# Altium PCB MainBoardPCB_3.PcbDoc (part 15 of 36)
Units mm, origin at the board's own origin, x right, y up, seen from the top; angles counter-clockwise.
Board outline 258.95 x 308.86 mm, 16 copper layers (L1, L2 (GND), L3 (Sign), L4 (GND), L5 (Sign), L6 (PWR/GND), L7(PWR/GND), L8 (Plane_GND), L9 (PWR/GND), L10 (PWR/GND), L11 (PWR/GND), L12 (Sign), L13 (GND), L14 (Sign), L15 (GND), L16), stack 2.502 mm thick; 2402 components, 1749 nets, 8407 pads, 3409 vias.
Unrouted connection lines stored in the file: 4352.
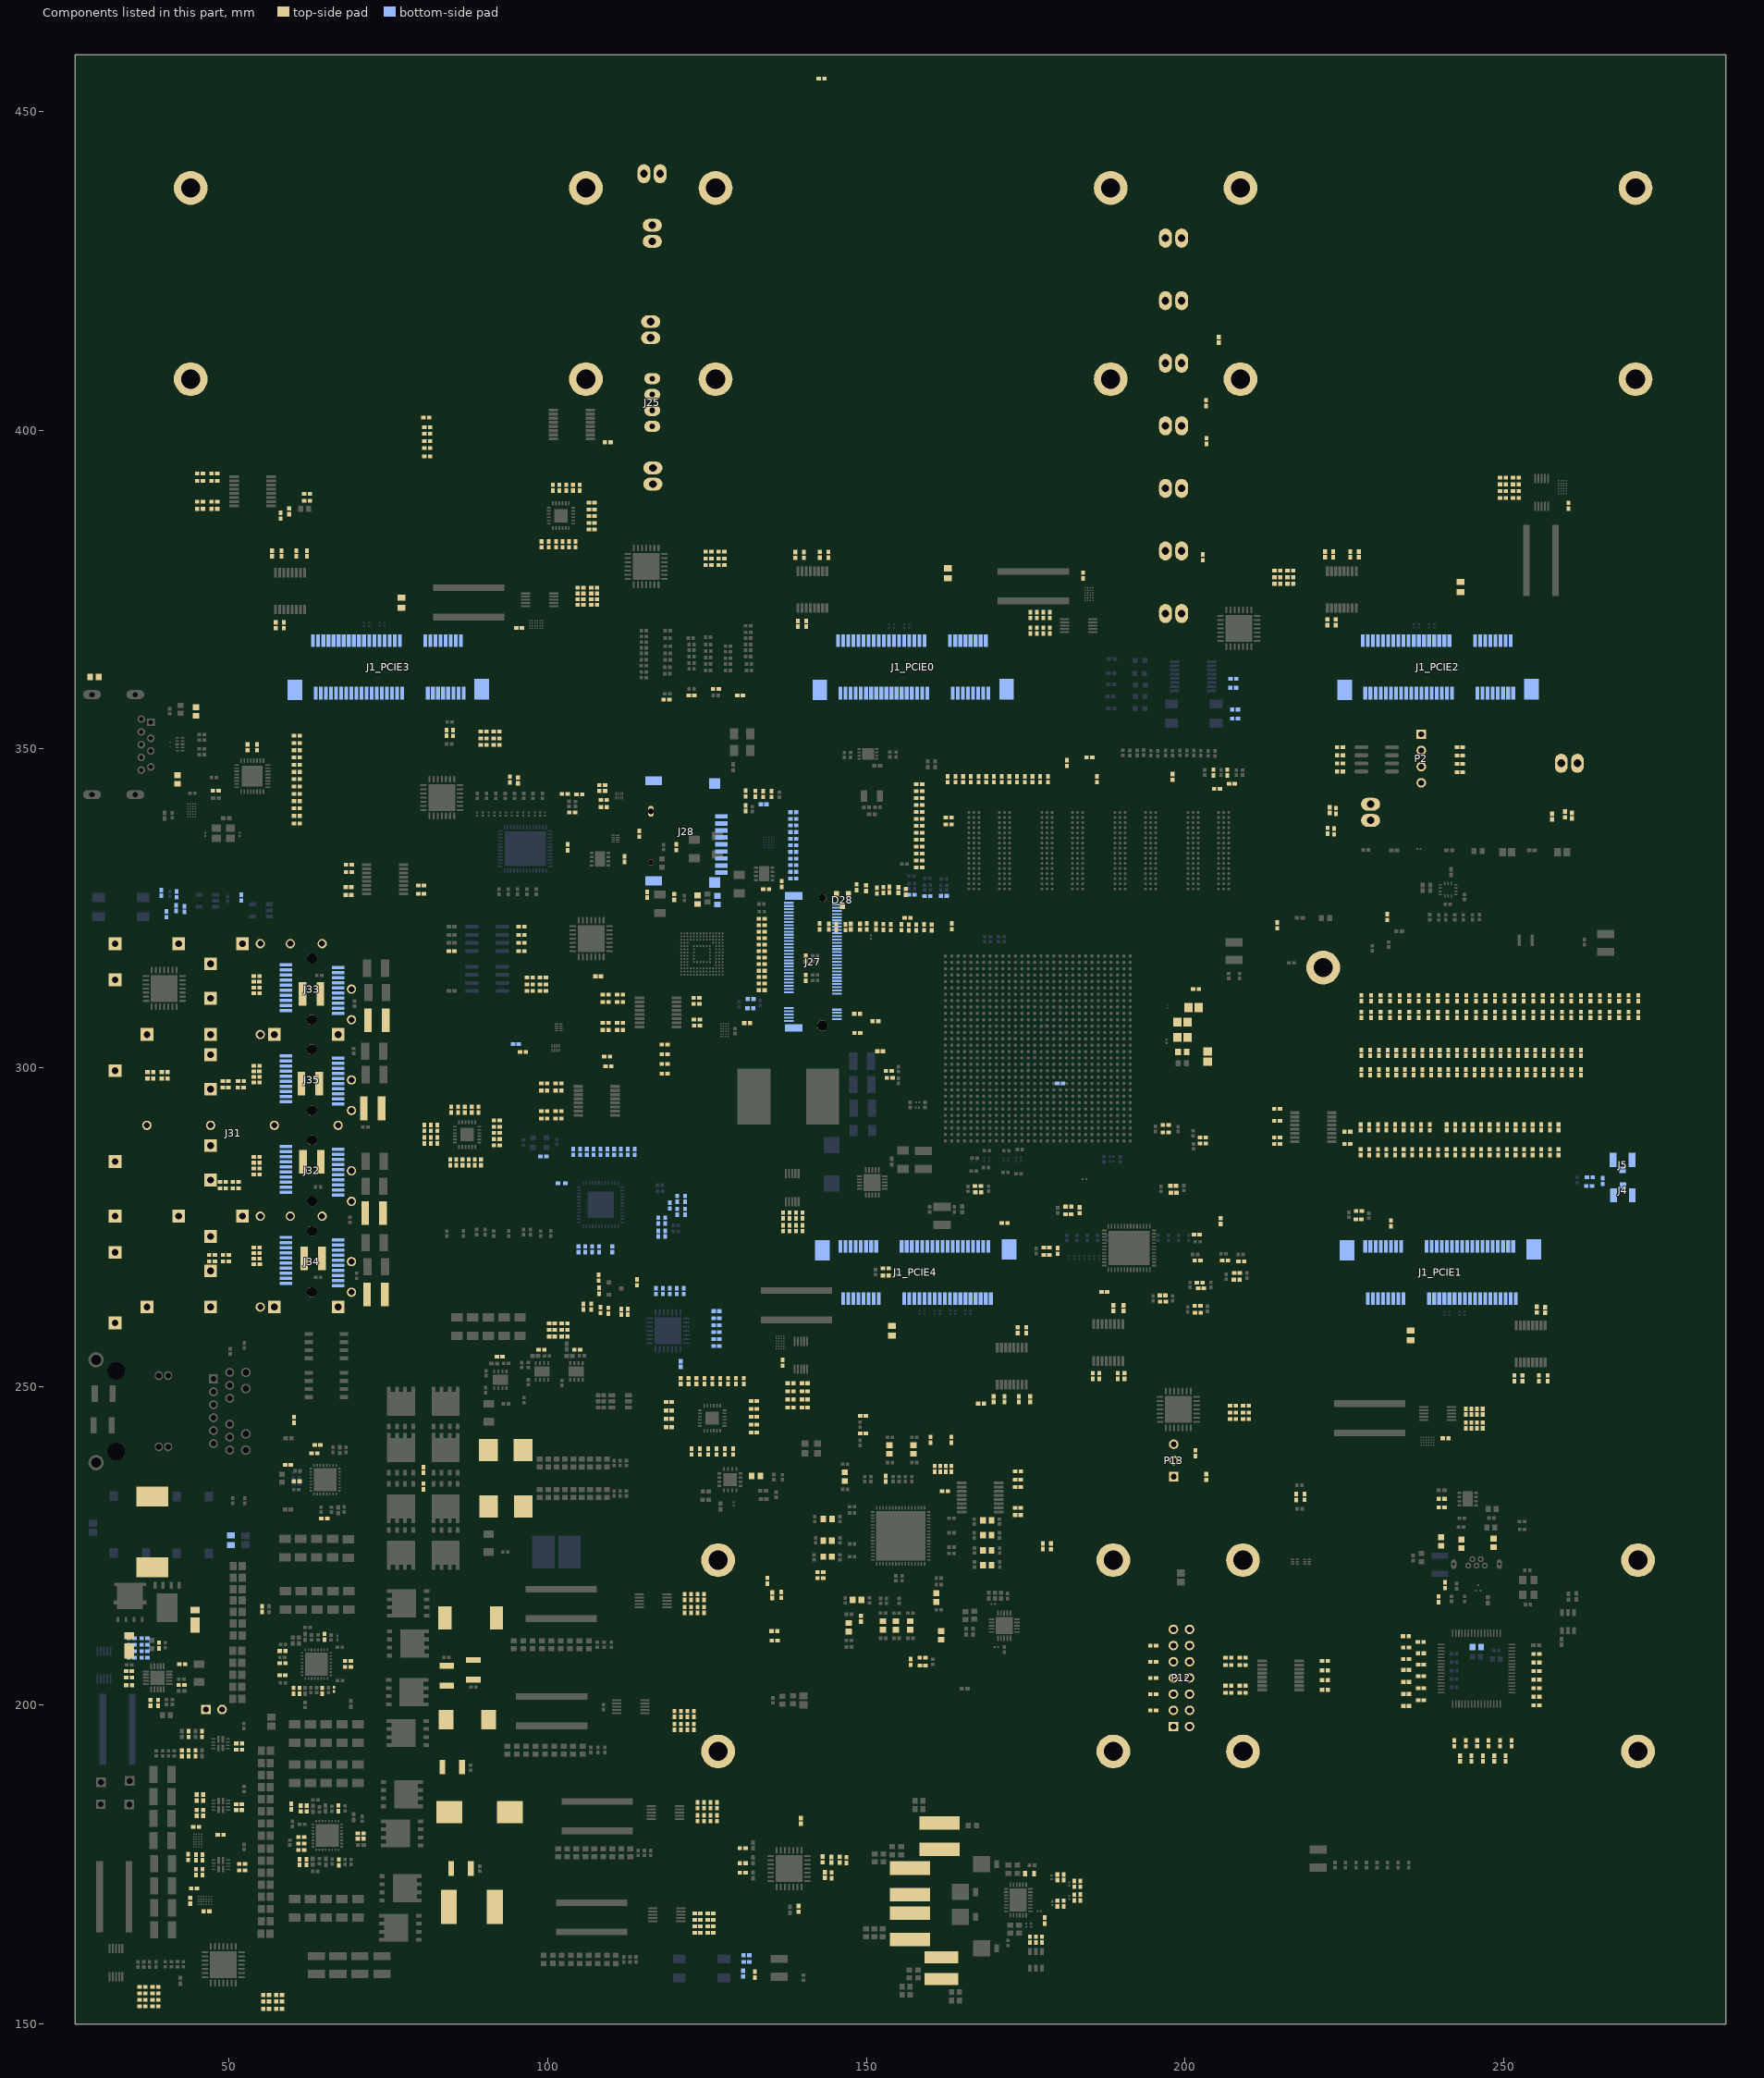
[diagram p20: the components of this part, seen from the top]

## Part data (continued)
R113: library part Resistor, "Thick Film Resistors 34.8K OHM 1%", Case Code (Imperial)=0402, Case Code (Metric)=1005, Manufacturer=Yageo, Manufacturer Part Number=RC0402FR-0734K8L, Max Operating Temperature=155°C, Max Power Dissipation=63mW, Min Operating Temperature=-55°C, Power Rating=62.5mW, Supplier Part Number 1=YAG3125CT-ND, Temperature Coefficient=100ppm/°C, Tolerance=1%, Voltage Rating=50V, Case/Package=0402, Category="Chip SMD Resistors", ComponentLink1Description=https://datasheet.ciiva.com/16857/pyu-rc0402-51-rohs-l-6-16857399.pdf?src-supplier=Avnet+Europe, ComponentLink1URL=https://datasheet.ciiva.com/16857/pyu-rc0402-51-rohs-l-6-16857399.pdf?src-supplier=Avnet+Europe, ComponentLink2Description=https://datasheet.ciiva.com/26830/getdatasheetpartid-323739-26830055.pdf?src-supplier=Verical, ComponentLink2URL=https://datasheet.ciiva.com/26830/getdatasheetpartid-323739-26830055.pdf?src-supplier=Verical, ComponentLink3Description=https://datasheet.ciiva.com/12656/pyu-rc0402-51-rohs-l-6-r-12656904.pdf?src-supplier=Mouser, ComponentLink3URL=https://datasheet.ciiva.com/12656/pyu-rc0402-51-rohs-l-6-r-12656904.pdf?src-supplier=Mouser, ComponentLink4Description=https://datasheet.ciiva.com/28400/pyu-rc0402-51-rohs-l-6-28400889.pdf?src-supplier=Avnet+Europe, ComponentLink4URL=https://datasheet.ciiva.com/28400/pyu-rc0402-51-rohs-l-6-28400889.pdf?src-supplier=Avnet+Europe, ComponentLink5Description=https://datasheet.ciiva.com/8889/pyu-rc0402-51-rohs-l-6-8889501.pdf?src-supplier=Avnet, ComponentLink5URL=https://datasheet.ciiva.com/8889/pyu-rc0402-51-rohs-l-6-8889501.pdf?src-supplier=Avnet, Composition="Thick Film", Contact Plating=Tin,Matte, Depth=0.5mm, Features="Moisture Resistant", Height=0.016inch, Lead Free="Lead Free", Length=1mm, Military Standard=Not, Number of Terminations=2, Packaging="Tape and Reel", Pricing 1="1=0,10000, 10=0,01600, 100=0,00640, 1000=0,00289, 2500=0,00251, 5000=0,00207 (USD)", Resistance=34.8kR, RoHS=Yes, Stock 1=121134, Supplier 1=Digi-Key, Termination=SMD/SMT, Voltage Rating (DC)=50V, Width=0.02inch
R114 R274 R515 R522 R523 R531 R546 R548 R549 R551 R552 R554 R555 R557: library part Resistor, Case Code (Imperial)=0402, Case Code (Metric)=1005, Manufacturer 1=Yageo, Manufacturer Part Number 1=RC0402FR-0710KL, Max Operating Temperature=155°C, Min Operating Temperature=-55°C, Power Rating=62.5mW, Supplier Part Number 1=311-10.0KLRCT-ND, Temperature Coefficient=100ppm/°C, Tolerance=1%, Voltage Rating=50V, Case/Package=0402, ComponentLink1Description=https://datasheet.ciiva.com/7660/38568-7660787.pdf?src-supplier=Element14, ComponentLink1URL=https://datasheet.ciiva.com/7660/38568-7660787.pdf?src-supplier=Element14, ComponentLink2Description=https://datasheet.ciiva.com/7849/1784430-7849813.pdf?src-supplier=Element14, ComponentLink2URL=https://datasheet.ciiva.com/7849/1784430-7849813.pdf?src-supplier=Element14, ComponentLink3Description=https://datasheet.ciiva.com/7849/1686128-7849814.pdf?src-supplier=Element14, ComponentLink3URL=https://datasheet.ciiva.com/7849/1686128-7849814.pdf?src-supplier=Element14, ComponentLink4Description=https://datasheet.ciiva.com/7849/1784430-7849815.pdf?src-supplier=Element14, ComponentLink4URL=https://datasheet.ciiva.com/7849/1784430-7849815.pdf?src-supplier=Element14, ComponentLink5Description=https://datasheet.ciiva.com/22747/1018594-22747512.pdf?src-supplier=Element14, ComponentLink5URL=https://datasheet.ciiva.com/22747/1018594-22747512.pdf?src-supplier=Element14, ComponentLink6Description=https://datasheet.ciiva.com/12667/pyu-rc0402-51-rohs-l-6-r-12667067.pdf?src-supplier=Mouser, ComponentLink6URL=https://datasheet.ciiva.com/12667/pyu-rc0402-51-rohs-l-6-r-12667067.pdf?src-supplier=Mouser, ComponentLink7Description=https://datasheet.ciiva.com/7983/1018594-7983486.pdf?src-supplier=Element14, ComponentLink7URL=https://datasheet.ciiva.com/7983/1018594-7983486.pdf?src-supplier=Element14, Composition="Thick Film", Depth=0.5mm, Height=0.32mm, Lead Free="Lead Free", Lead Pitch=0.2mm, Length=1mm, Military Standard=Not, Number of Pins=2, Number of Terminations=2, Packaging="Tape and Reel", Pricing 1="1=0,10000, 10=0,01500, 100=0,00600, 1000=0,00270, 2500=0,00235, 5000=0,00194 (USD)", REACH SVHC="No SVHC", Resistance=10kR, RoHS=Yes, Stock 1=71214322, Supplier 1=Digi-Key, Termination=SMD/SMT, Voltage Rating (DC)=50V, Width=0.5mm, Working Voltage=50V
R127 R128 R129 R366: library part Resistor, "SMT Resistor", Case/Package=0402, Case Code (Metric)=1005, Manufacturer=Panasonic, Manufacturer Part Number=ERJ-2RKF1002X, Max Operating Temperature=155°C, Max Power Dissipation=100mW, Min Operating Temperature=-55°C, Package Quantity=1, Supplier Part Number 1=P10.0KLCT-ND, Temperature Coefficient=100ppm/°C, Tolerance=1%, Voltage Rating=50V, Case Code (Imperial)=0402, ComponentLink1Description=https://datasheet.ciiva.com/11821/0900766b80f80784-11821171.pdf?src-supplier=RSComponents, ComponentLink1URL=https://datasheet.ciiva.com/11821/0900766b80f80784-11821171.pdf?src-supplier=RSComponents, ComponentLink2Description=https://datasheet.ciiva.com/16199/aoa0000ce2-16199478.pdf?src-supplier=Future+Electronics, ComponentLink2URL=https://datasheet.ciiva.com/16199/aoa0000ce2-16199478.pdf?src-supplier=Future+Electronics, ComponentLink3Description=https://datasheet.ciiva.com/17212/aoa0000ce2-17212102.pdf?src-supplier=Avnet+Europe, ComponentLink3URL=https://datasheet.ciiva.com/17212/aoa0000ce2-17212102.pdf?src-supplier=Avnet+Europe, ComponentLink4Description=https://datasheet.ciiva.com/43467/1678782-43467402.pdf?src-supplier=Farnell, ComponentLink4URL=https://datasheet.ciiva.com/43467/1678782-43467402.pdf?src-supplier=Farnell, ComponentLink5Description=https://datasheet.ciiva.com/9194/aoa0000ce2-9194142.pdf?src-supplier=Avnet, ComponentLink5URL=https://datasheet.ciiva.com/9194/aoa0000ce2-9194142.pdf?src-supplier=Avnet, ComponentLink6Description=https://datasheet.ciiva.com/16786/70260748-16786734.pdf?src-supplier=Allied+Electronics, ComponentLink6URL=https://datasheet.ciiva.com/16786/70260748-16786734.pdf?src-supplier=Allied+Electronics, ComponentLink7Description=https://datasheet.ciiva.com/24023/aoa0000ce2-24023017.pdf?src-supplier=Mouser, ComponentLink7URL=https://datasheet.ciiva.com/24023/aoa0000ce2-24023017.pdf?src-supplier=Mouser, ComponentLink8Description=https://datasheet.ciiva.com/28514/1678782-28514185.pdf?src-supplier=Element14, ComponentLink8URL=https://datasheet.ciiva.com/28514/1678782-28514185.pdf?src-supplier=Element14, ComponentLink9Description=https://datasheet.ciiva.com/27055/1987020-27055643.pdf?src-supplier=Jameco, ComponentLink9URL=https://datasheet.ciiva.com/27055/1987020-27055643.pdf?src-supplier=Jameco, ComponentLink10Description=https://datasheet.ciiva.com/48531/aoa0000ce2-48531069.pdf?src-supplier=Avnet, ComponentLink10URL=https://datasheet.ciiva.com/48531/aoa0000ce2-48531069.pdf?src-supplier=Avnet, ComponentLink11Description=https://datasheet.ciiva.com/16782/70260748-16782590.pdf?src-supplier=Allied+Electronics, ComponentLink11URL=https://datasheet.ciiva.com/16782/70260748-16782590.pdf?src-supplier=Allied+Electronics, ComponentLink12Description=https://datasheet.ciiva.com/30201/aoa0000ce2-30201022.pdf?src-supplier=Onlinecomponents.com, ComponentLink12URL=https://datasheet.ciiva.com/30201/aoa0000ce2-30201022.pdf?src-supplier=Onlinecomponents.com, Composition="Thick Film", Contact Plating=Tin, Depth=0.5mm, Features="Automotive AEC-Q200", Height=0.35mm, Lead Free="Lead Free", Length=1mm, Military Standard=Not, Mount="Surface Mount", Number of Pins=2, Number of Terminations=2, Packaging="Tape and Reel", Power Rating=100mW, Pricing 1="1 = 0,10000, 10 = 0,04300, 100 = 0,01750, 1000 = 0,00787, 2500 = 0,00683, 5000 = 0,00564 (USD)", Radiation Hardening=No, REACH SVHC="No SVHC", Resistance=10kR, RoHS=Yes, Stock 1=7512515, Supplier 1=Digi-Key, Termination=SMD/SMT, Voltage Rating (DC)=50V, Width=0.02inch
R140: library part Resistor, "RES SMD 2.2 OHM 5% 1/16W 0402", Case Code (Imperial)=0402, Case Code (Metric)=1005, Manufacturer=Yageo, Manufacturer Part Number=RC0402JR-072R2L, Max Operating Temperature=155°C, Max Power Dissipation=63mW, Min Operating Temperature=-55°C, Package Quantity=1, Power Rating=62.5mW, Supplier Part Number 1=311-2.2JRCT-ND, Temperature Coefficient=200ppm/°C, Tolerance=5%, Voltage Rating=50V, Case/Package=0402, Category="Chip SMD Resistors", ComponentLink1Description=https://datasheet.ciiva.com/2452/pyu-r-int-thick-7-2452737.pdf?src-supplier=Digi-Key, ComponentLink1URL=https://datasheet.ciiva.com/2452/pyu-r-int-thick-7-2452737.pdf?src-supplier=Digi-Key, ComponentLink2Description=https://datasheet.ciiva.com/2452/pyu-r-int-thick-7-2452738.pdf?src-supplier=Digi-Key, ComponentLink2URL=https://datasheet.ciiva.com/2452/pyu-r-int-thick-7-2452738.pdf?src-supplier=Digi-Key, ComponentLink3Description=https://datasheet.ciiva.com/2452/pyu-r-int-thick-7-2452739.pdf?src-supplier=Digi-Key, ComponentLink3URL=https://datasheet.ciiva.com/2452/pyu-r-int-thick-7-2452739.pdf?src-supplier=Digi-Key, ComponentLink4Description=https://datasheet.ciiva.com/28639/1018594-28639893.pdf?src-supplier=Element14, ComponentLink4URL=https://datasheet.ciiva.com/28639/1018594-28639893.pdf?src-supplier=Element14, ComponentLink5Description=https://datasheet.ciiva.com/28415/pyu-rc0402-51-rohs-l-6-28415222.pdf?src-supplier=Avnet+Europe, ComponentLink5URL=https://datasheet.ciiva.com/28415/pyu-rc0402-51-rohs-l-6-28415222.pdf?src-supplier=Avnet+Europe, ComponentLink6Description=https://datasheet.ciiva.com/16863/pyu-rc0402-51-rohs-l-6-16863111.pdf?src-supplier=Avnet+Europe, ComponentLink6URL=https://datasheet.ciiva.com/16863/pyu-rc0402-51-rohs-l-6-16863111.pdf?src-supplier=Avnet+Europe, ComponentLink7Description=https://datasheet.ciiva.com/8894/pyu-rc0402-51-rohs-l-6-8894569.pdf?src-supplier=Avnet, ComponentLink7URL=https://datasheet.ciiva.com/8894/pyu-rc0402-51-rohs-l-6-8894569.pdf?src-supplier=Avnet, ComponentLink8Description=https://datasheet.ciiva.com/15189/getdatasheetpartid-470524-15189562.pdf?src-supplier=Verical, ComponentLink8URL=https://datasheet.ciiva.com/15189/getdatasheetpartid-470524-15189562.pdf?src-supplier=Verical, ComponentLink9Description=https://datasheet.ciiva.com/12557/pyu-rc0402-51-rohs-l-6-r-8721-12557918.pdf?src-supplier=Mouser, ComponentLink9URL=https://datasheet.ciiva.com/12557/pyu-rc0402-51-rohs-l-6-r-8721-12557918.pdf?src-supplier=Mouser, Composition="Thick Film", Contact Plating=Tin,Matte,Lead, Depth=0.5mm, Features="Moisture Resistant", Height=0.016inch, Lead Free="Lead Free", Length=1mm, Military Standard=Not, Number of Pins=2, Number of Terminations=2, Packaging="Tape and Reel", Pricing 1="1=0,10000, 10=0,01900, 100=0,00760, 1000=0,00342, 2500=0,00297, 5000=0,00245 (USD)", Radiation Hardening=No, REACH SVHC="No SVHC", Resistance=2.2R, RoHS=Yes, Stock 1=928927, Supplier 1=Digi-Key, Termination=SMD/SMT, Voltage Rating (DC)=50V, Width=0.02inch, Working Voltage=50V
R149: library part Resistor, "Thick Film Resistors - SMD 196K OHM 1%", Case/Package=0402, Case Code (Metric)=1005, Manufacturer=Yageo, Manufacturer Part Number=RC0402FR-07196KL, Max Operating Temperature=155°C, Max Power Dissipation=63mW, Min Operating Temperature=-55°C, Power Rating=62.5mW, Supplier Part Number 1=YAG3024CT-ND, Temperature Coefficient=100ppm/°C, Tolerance=1%, Voltage Rating=50V, Case Code (Imperial)=0402, Category="Chip SMD Resistors", ComponentLink1Description=https://datasheet.ciiva.com/28419/pyu-rc0402-51-rohs-l-6-28419942.pdf?src-supplier=Avnet+Europe, ComponentLink1URL=https://datasheet.ciiva.com/28419/pyu-rc0402-51-rohs-l-6-28419942.pdf?src-supplier=Avnet+Europe, ComponentLink2Description=https://datasheet.ciiva.com/16869/pyu-rc0402-51-rohs-l-6-16869399.pdf?src-supplier=Avnet+Europe, ComponentLink2URL=https://datasheet.ciiva.com/16869/pyu-rc0402-51-rohs-l-6-16869399.pdf?src-supplier=Avnet+Europe, Composition="Thick Film", Contact Plating=Tin,Lead, Depth=0.5mm, Features="Moisture Resistant", Height=0.016inch, Lead Free="Lead Free", Length=1mm, Military Standard=Not, Number of Terminations=2, Packaging="Tape and Reel", Pricing 1="1=0,10000, 10=0,01600, 100=0,00640, 1000=0,00289, 2500=0,00251, 5000=0,00207 (USD)", Radiation Hardening=No, Resistance=196kR, RoHS=Yes, Stock 1=126965, Supplier 1=Digi-Key, Termination=SMD/SMT, Width=0.5mm
R150: library part Resistor, "TE CONNECTIVITY - CRGCQ0402F22K - RES, 22K, 1%, 0402, THICK FILM", Manufacturer="TE Connectivity", Manufacturer Part Number=CRGCQ0402F22K, Supplier Part Number 1=A129643CT-ND, ComponentLink1Description=http://www.farnell.com/datasheets/2609223.pdf?src-supplier=Farnell, ComponentLink1URL=http://www.farnell.com/datasheets/2609223.pdf?src-supplier=Farnell, Pricing 1="1=0,10000, 10=0,02100, 100=0,00860, 1000=0,00387, 2500=0,00336, 5000=0,00277 (USD)", RoHS=No, Stock 1=153295, Supplier 1=Digi-Key
R159 R737 R746 R747 R748 R749 R750 R751 R752 R753 R754 R755 R756 R757 R1002 R1003: library part Resistor, "Surface Mount Thick Film Resistor, Rc Series, 10 Kohm, 62.5 Mw, - 1%, 50 V, 0402 [1005 Metric]", Case/Package=0402, Case Code (Metric)=1005, Manufacturer=Yageo, Manufacturer Part Number=RC0402FR-0710KL, Max Operating Temperature=155°C, Min Operating Temperature=-55°C, Power Rating=62.5mW, Supplier Part Number 1=311-10.0KLRDKR-ND, Temperature Coefficient=100ppm/°C, Tolerance=1%, Voltage Rating=50V, Case Code (Imperial)=0402, Category="Chip SMD Resistors", ComponentLink1Description=https://datasheet.ciiva.com/7660/38568-7660787.pdf?src-supplier=Element14, ComponentLink1URL=https://datasheet.ciiva.com/7660/38568-7660787.pdf?src-supplier=Element14, ComponentLink2Description=https://datasheet.ciiva.com/7849/1784430-7849813.pdf?src-supplier=Element14, ComponentLink2URL=https://datasheet.ciiva.com/7849/1784430-7849813.pdf?src-supplier=Element14, ComponentLink3Description=https://datasheet.ciiva.com/7849/1686128-7849814.pdf?src-supplier=Element14, ComponentLink3URL=https://datasheet.ciiva.com/7849/1686128-7849814.pdf?src-supplier=Element14, ComponentLink4Description=https://datasheet.ciiva.com/7849/1784430-7849815.pdf?src-supplier=Element14, ComponentLink4URL=https://datasheet.ciiva.com/7849/1784430-7849815.pdf?src-supplier=Element14, ComponentLink5Description=https://datasheet.ciiva.com/22747/1018594-22747512.pdf?src-supplier=Element14, ComponentLink5URL=https://datasheet.ciiva.com/22747/1018594-22747512.pdf?src-supplier=Element14, ComponentLink6Description=https://datasheet.ciiva.com/12667/pyu-rc0402-51-rohs-l-6-r-12667067.pdf?src-supplier=Mouser, ComponentLink6URL=https://datasheet.ciiva.com/12667/pyu-rc0402-51-rohs-l-6-r-12667067.pdf?src-supplier=Mouser, ComponentLink7Description=https://datasheet.ciiva.com/7983/1018594-7983486.pdf?src-supplier=Element14, ComponentLink7URL=https://datasheet.ciiva.com/7983/1018594-7983486.pdf?src-supplier=Element14, Composition="Thick Film", Depth=0.5mm, Height=0.32mm, Lead Free="Lead Free", Lead Pitch=0.2mm, Length=1mm, Military Standard=Not, Number of Pins=2, Number of Terminations=2, Packaging="Tape and Reel", Pricing 1="1=0,10000, 10=0,01600, 100=0,00640, 1000=0,00289, 2500=0,00251, 5000=0,00207 (USD)", REACH SVHC="No SVHC", Resistance=10kR, RoHS=Yes, Stock 1=50506721, Supplier 1=Digi-Key, Termination=SMD/SMT, Voltage Rating (DC)=50V, Width=0.5mm, Working Voltage=50V
R160: library part Resistor, "RES SMD 910 OHM 5% 1/10W 0402", Case Code (Imperial)=0402, Case Code (Metric)=1005, Manufacturer=Panasonic, Manufacturer Part Number=ERJ2GEJ911X, Max Operating Temperature=155°C, Max Power Dissipation=100mW, Min Operating Temperature=-55°C, Package Quantity=1, Supplier Part Number 1=P910JCT-ND, Temperature Coefficient=200ppm/°C, Tolerance=5%, Voltage Rating=50V, Case/Package=0402, Category="Chip SMD Resistors", ComponentLink1Description=https://datasheet.ciiva.com/11821/0900766b80f806dd-11821385.pdf?src-supplier=RSComponents, ComponentLink1URL=https://datasheet.ciiva.com/11821/0900766b80f806dd-11821385.pdf?src-supplier=RSComponents, ComponentLink2Description=https://datasheet.ciiva.com/9119/aoa0000ce1-9119175.pdf?src-supplier=Avnet, ComponentLink2URL=https://datasheet.ciiva.com/9119/aoa0000ce1-9119175.pdf?src-supplier=Avnet, ComponentLink3Description=https://datasheet.ciiva.com/24071/aoa0000ce1-37422-24071816.pdf?src-supplier=Mouser, ComponentLink3URL=https://datasheet.ciiva.com/24071/aoa0000ce1-37422-24071816.pdf?src-supplier=Mouser, ComponentLink4Description=https://datasheet.ciiva.com/30072/4aoa0000ce1-30072265.pdf?src-supplier=Onlinecomponents.com, ComponentLink4URL=https://datasheet.ciiva.com/30072/4aoa0000ce1-30072265.pdf?src-supplier=Onlinecomponents.com, ComponentLink5Description=https://datasheet.ciiva.com/46379/1678796-46379916.pdf?src-supplier=Element14, ComponentLink5URL=https://datasheet.ciiva.com/46379/1678796-46379916.pdf?src-supplier=Element14, ComponentLink6Description=https://datasheet.ciiva.com/43470/1678796-43470111.pdf?src-supplier=Farnell, ComponentLink6URL=https://datasheet.ciiva.com/43470/1678796-43470111.pdf?src-supplier=Farnell, Composition="Thick Film", Contact Plating=Tin, Depth=0.5mm, Height=0.35mm, Lead Free="Contains Lead", Length=1mm, Military Standard=Not, Mount="Surface Mount", Number of Terminations=2, Packaging="Tape and Reel", Power Rating=100mW, Pricing 1="1=0,10000, 10=0,02700, 100=0,01100, 1000=0,00496, 2500=0,00430, 5000=0,00355 (USD)", Radiation Hardening=No, REACH SVHC="No SVHC", Resistance=910R, RoHS=Yes, Stock 1=129458, Supplier 1=Digi-Key, Termination=SMD/SMT, Voltage Rating (DC)=50V, Width=0.02inch
R165 R166 R167 R168 R169 R170 R171 R172: library part Resistor, "RES SMD 100 OHM 1% 1/16W 0402", Case Code (Imperial)=0402, Case Code (Metric)=1005, Manufacturer=Yageo, Manufacturer Part Number=RC0402FR-07100RL, Max Operating Temperature=155°C, Min Operating Temperature=-55°C, Power Rating=62.5mW, Supplier Part Number 1=311-100LRDKR-ND, Temperature Coefficient=100ppm/°C, Tolerance=1%, Voltage Rating=50V, Case/Package=0402, Category="Chip SMD Resistors", ComponentLink1Description=https://datasheet.ciiva.com/7849/1784430-7849810.pdf?src-supplier=Element14, ComponentLink1URL=https://datasheet.ciiva.com/7849/1784430-7849810.pdf?src-supplier=Element14, ComponentLink2Description=https://datasheet.ciiva.com/11808/0900766b80c66297-11808765.pdf?src-supplier=RSComponents, ComponentLink2URL=https://datasheet.ciiva.com/11808/0900766b80c66297-11808765.pdf?src-supplier=RSComponents, ComponentLink3Description=https://datasheet.ciiva.com/12667/pyu-rc0402-51-rohs-l-6-r-12667957.pdf?src-supplier=Mouser, ComponentLink3URL=https://datasheet.ciiva.com/12667/pyu-rc0402-51-rohs-l-6-r-12667957.pdf?src-supplier=Mouser, ComponentLink4Description=https://datasheet.ciiva.com/16740/pyu-rc0402-51-rohs-l-6-r-16740566.pdf?src-supplier=Future+Electronics, ComponentLink4URL=https://datasheet.ciiva.com/16740/pyu-rc0402-51-rohs-l-6-r-16740566.pdf?src-supplier=Future+Electronics, ComponentLink5Description=https://datasheet.ciiva.com/15189/getdatasheetpartid-329466-15189335.pdf?src-supplier=Verical, ComponentLink5URL=https://datasheet.ciiva.com/15189/getdatasheetpartid-329466-15189335.pdf?src-supplier=Verical, ComponentLink6Description=https://datasheet.ciiva.com/28367/1018594-28367226.pdf?src-supplier=Element14, ComponentLink6URL=https://datasheet.ciiva.com/28367/1018594-28367226.pdf?src-supplier=Element14, ComponentLink7Description=https://datasheet.ciiva.com/22747/1018594-22747511.pdf?src-supplier=Element14, ComponentLink7URL=https://datasheet.ciiva.com/22747/1018594-22747511.pdf?src-supplier=Element14, Composition="Thick Film", Depth=0.5mm, Height=0.32mm, Lead Free="Lead Free", Length=1mm, Military Standard=Not, Number of Pins=2, Packaging="Tape and Reel", Pricing 1="1=0,10000, 10=0,01600, 100=0,00640, 1000=0,00289, 2500=0,00251, 5000=0,00207 (USD)", REACH SVHC="No SVHC", Resistance=100R, RoHS=Yes, Stock 1=42078262, Supplier 1=Digi-Key, Termination=SMD/SMT, Voltage Rating (DC)=50V, Width=0.5mm
R173: library part Resistor, "RES SMD 500 OHM 0.1% 1/20W 0402", Case/Package=0402, Case Code (Metric)=1005, Manufacturer="Vishay Dale", Manufacturer Part Number=PNM0402E5000BST1, Max Operating Temperature=155°C, Max Power Dissipation=50mW, Min Operating Temperature=-55°C, Package Quantity=1000, Supplier Part Number 1=541-1905-1-ND, Temperature Coefficient=25ppm/°C, Tolerance=0.1%, Case Code (Imperial)=0402, Category="Chip SMD Resistors", ComponentLink1Description=https://datasheet.ciiva.com/29717/pnm-29717420.pdf?src-supplier=Digi-Key, ComponentLink1URL=https://datasheet.ciiva.com/29717/pnm-29717420.pdf?src-supplier=Digi-Key, ComponentLink2Description=https://datasheet.ciiva.com/29717/pnm-29717419.pdf?src-supplier=Digi-Key, ComponentLink2URL=https://datasheet.ciiva.com/29717/pnm-29717419.pdf?src-supplier=Digi-Key, ComponentLink3Description=https://datasheet.ciiva.com/29717/pnm-29717421.pdf?src-supplier=Digi-Key, ComponentLink3URL=https://datasheet.ciiva.com/29717/pnm-29717421.pdf?src-supplier=Digi-Key, Composition="Thin Film", Features="Moisture Resistant,Anti-Sulfur", Height=0.033inch, Lead Free="Lead Free", Length=0.042inch, Number of Terminations=2, Packaging="Tape and Reel", Pricing 1="1=1,08000, 10=0,95500, 100=0,69300 (USD)", Resistance=500R, RoHS=Yes, Stock 1=28724, Supplier 1=Digi-Key, Width=0.022inch
R212: library part Resistor, "SMT Resistor", Supplier Part Number 1=RR05P12.4KDCT-ND, Supplier 1=Digi-Key
R216: library part Resistor, Case/Package=0402, Manufacturer="Vishay Dale", Manufacturer Part Number=TNPW040231K2BEED, Max Operating Temperature=125°C, Max Power Dissipation=63mW, Min Operating Temperature=-55°C, Supplier Part Number 1=541-3564-1-ND, Temperature Coefficient=25ppm/°C, Tolerance=0.1%, ComponentLink1Description=https://datasheet.ciiva.com/9018/tnpw-e3-9018042.pdf?src-supplier=Avnet, ComponentLink1URL=https://datasheet.ciiva.com/9018/tnpw-e3-9018042.pdf?src-supplier=Avnet, Composition="Thin Film", Contact Plating=Tin, Features="Moisture Resistant,Automotive AEC-Q200,Anti-Sulfur", Height=0.016inch, Length=0.039inch, Number of Terminations=2, Packaging="Tape and Reel", Pricing 1="1 = 0,62000, 10 = 0,44000, 100 = 0,22880, 1000 = 0,12320, 2500 = 0,11968 (USD)", Radiation Hardening=No, Resistance=31.2kR, RoHS=Yes, Stock 1=4196, Supplier 1=Digi-Key, Width=0.02inch
R220: library part Resistor, Case Code (Imperial)=0402, Case Code (Metric)=1005, Manufacturer=Panasonic, Manufacturer Part Number=ERA-2AEB4991X, Max Operating Temperature=155°C, Max Power Dissipation=63mW, Min Operating Temperature=-55°C, Package Quantity=1, Power Rating=62.5mW, Supplier Part Number 1=P4.99KDCCT-ND, Temperature Coefficient=25ppm/°C, Tolerance=0.1%, Voltage Rating=50V, Case/Package=0402, ComponentLink1Description=https://datasheet.ciiva.com/30094/54aoa0000ce26-30094171.pdf?src-supplier=Onlinecomponents.com, ComponentLink1URL=https://datasheet.ciiva.com/30094/54aoa0000ce26-30094171.pdf?src-supplier=Onlinecomponents.com, Composition="Thin Film", Features="Automotive AEC-Q200", Height=0.016inch, Lead Free="Lead Free", Length=0.039inch, Mount="Surface Mount", Number of Terminations=2, Packaging="Tape and Reel", Pricing 1="1 = 0,45000, 10 = 0,32100, 100 = 0,12830, 1000 = 0,06322, 2500 = 0,05858, 5000 = 0,05300 (USD)", REACH SVHC=Unknown, Resistance=4.99kR, RoHS=Yes, Stock 1=146974, Supplier 1=Digi-Key, Voltage Rating (DC)=50V, Width=0.02inch
R246 R249 R256 R258: library part Resistor, "Res Thin Film 0402 120 Ohm 0.5% 1/16W ±25ppm/C Molded SMD Punched Carrier T/R", Case Code (Imperial)=0402, Case Code (Metric)=1005, Manufacturer=Panasonic, Manufacturer Part Number=ERA-2AED121X, Max Operating Temperature=155°C, Max Power Dissipation=63mW, Min Operating Temperature=-55°C, Package Quantity=10000, Supplier Part Number 1=P120DECT-ND, Temperature Coefficient=25ppm/°C, Tolerance=0.5%, Voltage Rating=25V, Case/Package=0402, Category="Chip SMD Resistors", ComponentLink1Description=https://datasheet.ciiva.com/43470/1776116-43470439.pdf?src-supplier=Farnell, ComponentLink1URL=https://datasheet.ciiva.com/43470/1776116-43470439.pdf?src-supplier=Farnell, ComponentLink2Description=https://datasheet.ciiva.com/9186/aoa0000ce26-9186152.pdf?src-supplier=Avnet, ComponentLink2URL=https://datasheet.ciiva.com/9186/aoa0000ce26-9186152.pdf?src-supplier=Avnet, ComponentLink3Description=https://datasheet.ciiva.com/46378/1776116-46378233.pdf?src-supplier=Element14, ComponentLink3URL=https://datasheet.ciiva.com/46378/1776116-46378233.pdf?src-supplier=Element14, Composition="Thin Film,Metal Film", Contact Plating=Tin, Depth=0.5mm, Features="Automotive AEC-Q200", Height=0.016inch, Lead Free="Lead Free", Length=1mm, Military Standard=Not, Mount="Surface Mount", Number of Terminations=2, Packaging="Tape and Reel", Power Rating=63mW, Pricing 1="1=0,22000, 10=0,18800, 100=0,07350, 1000=0,03077, 2500=0,02820, 5000=0,02564 (USD)", REACH SVHC="No SVHC", Resistance=120R, RoHS=Yes, Stock 1=19700, Supplier 1=Digi-Key, Termination=SMD/SMT, Voltage Rating (DC)=25V, Weight=2.8E-05oz, Width=0.02inch
R247 R248 R261 R262: library part Resistor, "Res Thick Film 0402 127 Ohm 1% 0.063W(1/16W) �}100ppm/�? Molded SMD Paper T/R", Case Code (Imperial)=0402, Case Code (Metric)=1005, Manufacturer=Yageo, Manufacturer Part Number=RC0402FR-07127RL, Max Operating Temperature=155°C, Max Power Dissipation=63mW, Min Operating Temperature=-55°C, Power Rating=62.5mW, Supplier Part Number 1=YAG2963CT-ND, Temperature Coefficient=100ppm/°C, Tolerance=1%, Voltage Rating=50V, Case/Package=0402, Category="Chip SMD Resistors", ComponentLink1Description=https://datasheet.ciiva.com/16869/pyu-rc0402-51-rohs-l-6-16869784.pdf?src-supplier=Avnet+Europe, ComponentLink1URL=https://datasheet.ciiva.com/16869/pyu-rc0402-51-rohs-l-6-16869784.pdf?src-supplier=Avnet+Europe, ComponentLink2Description=https://datasheet.ciiva.com/17424/pyu-rc0402-51-rohs-l-6-r-17424008.pdf?src-supplier=Future+Electronics, ComponentLink2URL=https://datasheet.ciiva.com/17424/pyu-rc0402-51-rohs-l-6-r-17424008.pdf?src-supplier=Future+Electronics, ComponentLink3Description=https://datasheet.ciiva.com/12577/pyu-rc0402-51-rohs-l-6-r-12577547.pdf?src-supplier=Mouser, ComponentLink3URL=https://datasheet.ciiva.com/12577/pyu-rc0402-51-rohs-l-6-r-12577547.pdf?src-supplier=Mouser, ComponentLink4Description=https://datasheet.ciiva.com/8887/pyu-rc0402-51-rohs-l-6-8887502.pdf?src-supplier=Avnet, ComponentLink4URL=https://datasheet.ciiva.com/8887/pyu-rc0402-51-rohs-l-6-8887502.pdf?src-supplier=Avnet, Composition="Thick Film", Contact Plating=Tin,Matte, Depth=0.5mm, Features="Moisture Resistant", Height=0.016inch, Lead Free="Lead Free", Length=1mm, Military Standard=Not, Number of Terminations=2, Packaging="Tape and Reel", Pricing 1="1=0,10000, 10=0,01600, 100=0,00640, 1000=0,00289, 2500=0,00251, 5000=0,00207 (USD)", Resistance=127R, RoHS=Yes, Stock 1=246372, Supplier 1=Digi-Key, Termination=SMD/SMT, Weight=2.3E-05oz, Width=0.02inch
R250 R251 R259 R260: library part Resistor, "Res Thick Film 0402 82.5 Ohm 1% 0.063W(1/16W) ±100ppm/C Molded SMD Automotive Punched Paper T/R", Case Code (Imperial)=0402, Case Code (Metric)=1005, Manufacturer="KOA Speer", Manufacturer Part Number=RK73H1ETTP82R5F, Max Operating Temperature=155°C, Min Operating Temperature=-55°C, Package Quantity=10000, Power Rating=63mW, Supplier Part Number 1=2019-RK73H1ETTP82R5FCT-ND, Temperature Coefficient=100ppm/°C, Tolerance=1%, Voltage Rating=50V, Case/Package=0402, Category="Chip SMD Resistors", ComponentLink1Description=https://datasheet.ciiva.com/15159/getdatasheetpartid-72449-15159766.pdf?src-supplier=Verical, ComponentLink1URL=https://datasheet.ciiva.com/15159/getdatasheetpartid-72449-15159766.pdf?src-supplier=Verical, ComponentLink2Description=https://datasheet.ciiva.com/5553/rk73h-5553823.pdf?src-supplier=Mouser, ComponentLink2URL=https://datasheet.ciiva.com/5553/rk73h-5553823.pdf?src-supplier=Mouser, Composition="Thick Film", Depth=0.5mm, Height=0.35mm, Length=1mm, Military Standard=Not, Packaging="Tape and Reel", Pricing 1="1=0,10000, 10=0,02400, 100=0,00970, 1000=0,00437, 2500=0,00380, 5000=0,00314 (USD)", Resistance=82.5R, RoHS=Yes, Stock 1=27883, Supplier 1=Digi-Key, Termination=SMD/SMT, Voltage Rating (DC)=50V, Width=0.5mm
R257 R545: library part Resistor, "RES SMD 49.9 OHM 1% 1/16W 0402", Case Code (Imperial)=0402, Case Code (Metric)=1005, Manufacturer=Yageo, Manufacturer Part Number=RC0402FR-0749R9L, Max Operating Temperature=155°C, Max Power Dissipation=63mW, Min Operating Temperature=-55°C, Package Quantity=1, Power Rating=62.5mW, Supplier Part Number 1=311-49.9LRDKR-ND, Temperature Coefficient=100ppm/°C, Tolerance=1%, Voltage Rating=50V, Case/Package=0402, Category="Chip SMD Resistors", ComponentLink1Description=https://datasheet.ciiva.com/11819/0900766b80c66297-11819508.pdf?src-supplier=RSComponents, ComponentLink1URL=https://datasheet.ciiva.com/11819/0900766b80c66297-11819508.pdf?src-supplier=RSComponents, ComponentLink2Description=https://datasheet.ciiva.com/7983/1018594-7983542.pdf?src-supplier=Element14, ComponentLink2URL=https://datasheet.ciiva.com/7983/1018594-7983542.pdf?src-supplier=Element14, ComponentLink3Description=https://datasheet.ciiva.com/16743/pyu-rc0402-51-rohs-l-6-r-16743942.pdf?src-supplier=Future+Electronics, ComponentLink3URL=https://datasheet.ciiva.com/16743/pyu-rc0402-51-rohs-l-6-r-16743942.pdf?src-supplier=Future+Electronics, ComponentLink4Description=https://datasheet.ciiva.com/22747/1018594-22747514.pdf?src-supplier=Element14, ComponentLink4URL=https://datasheet.ciiva.com/22747/1018594-22747514.pdf?src-supplier=Element14, ComponentLink5Description=https://datasheet.ciiva.com/2453/pyu-r-int-thick-7-2453355.pdf?src-supplier=Digi-Key, ComponentLink5URL=https://datasheet.ciiva.com/2453/pyu-r-int-thick-7-2453355.pdf?src-supplier=Digi-Key, ComponentLink6Description=https://datasheet.ciiva.com/2453/pyu-r-int-thick-7-2453356.pdf?src-supplier=Digi-Key, ComponentLink6URL=https://datasheet.ciiva.com/2453/pyu-r-int-thick-7-2453356.pdf?src-supplier=Digi-Key, ComponentLink7Description=https://datasheet.ciiva.com/2453/pyu-r-int-thick-7-2453357.pdf?src-supplier=Digi-Key, ComponentLink7URL=https://datasheet.ciiva.com/2453/pyu-r-int-thick-7-2453357.pdf?src-supplier=Digi-Key, Composition="Thick Film", Depth=0.5mm, Features="Moisture Resistant", Height=0.016inch, Lead Free="Lead Free", Length=1mm, Military Standard=Not, Number of Pins=2, Number of Terminations=2, Packaging="Tape and Reel", Pricing 1="1=0,10000, 10=0,01600, 100=0,00640, 1000=0,00289, 2500=0,00251, 5000=0,00207 (USD)", REACH SVHC="No SVHC", Resistance=49.9R, RoHS=Yes, Stock 1=13702459, Supplier 1=Digi-Key, Termination=SMD/SMT, Voltage Rating (DC)=50V, Width=0.5mm, Working Voltage=50V
R263: library part Resistor, "RES 60.4K OHM 1% 1/16W 0402", Case Code (Imperial)=0402, Case Code (Metric)=1005, Manufacturer="Stackpole Electronics", Manufacturer Part Number=RMCF0402FT60K4, Max Operating Temperature=155°C, Max Power Dissipation=63mW, Min Operating Temperature=-55°C, Supplier Part Number 1=RMCF0402FT60K4CT-ND, Temperature Coefficient=100ppm/°C, Tolerance=1%, Case/Package=0402, Category="Chip SMD Resistors", ComponentLink1Description=https://www.seielect.com/catalog/SEI-RMCF_RMCP.pdf?src-supplier=Avnet, ComponentLink1URL=https://www.seielect.com/catalog/SEI-RMCF_RMCP.pdf?src-supplier=Avnet, ComponentLink2Description=https://www.seielect.com/catalog/SEI-Packaging.pdf?src-supplier=Digi-Key, ComponentLink2URL=https://www.seielect.com/catalog/SEI-Packaging.pdf?src-supplier=Digi-Key, ComponentLink3Description=https://www.seielect.com/Catalog/SEI-RMCF_RMCP.pdf?src-supplier=Digi-Key, ComponentLink3URL=https://www.seielect.com/Catalog/SEI-RMCF_RMCP.pdf?src-supplier=Digi-Key, Composition="Thick Film", Contact Plating=Tin,Matte, Features="Automotive AEC-Q200", Height=0.016inch, Lead Free="Lead Free", Length=0.039inch, Mount="Surface Mount", Number of Terminations=2, Packaging="Tape and Reel", Pricing 1="1=0,10000, 10=0,01400, 100=0,00580, 1000=0,00262, 2500=0,00228, 5000=0,00188 (USD)", Radiation Hardening=No, Resistance=60.4kR, RoHS=Yes, Stock 1=39859, Supplier 1=Digi-Key, Width=0.02inch
R264 R265 R450 R452 R454 R456 R460 R464 R470 R472 R474 R476 R478 R480 R493 R495 R497 R501 R503 R505 R509 R511 R513 R516 R517 R518 R519 R520 R521 R524 R525 R526 R527 R528 R529 R537 R539 R1054 R1055 R1056 R1057 R1058 R1067 R1068 R1069 R1070 R1071 R1072 R1073 R1074 R1077 R1080 R1083 R1084 R1085 R1086 R1087 R1088 R1089 R1090 R1091 R1092 R1093 R1094 R1097 R1098 R1100 R1101 R1103 R1104 R1105 R1106 R1107 R1108 R1109 R1110: library part Resistor, Case Code (Imperial)=0402, Case Code (Metric)=1005, Manufacturer 1=Yageo, Manufacturer Part Number 1=RC0402JR-070RL, Max Operating Temperature=155°C, Max Power Dissipation=63mW, Min Operating Temperature=-55°C, Package Quantity=1, Power Rating=62.5mW, Supplier Part Number 1=311-0.0JRCT-ND, Temperature Coefficient=200ppm/°C, Tolerance=5%, Voltage Rating=50V, Case/Package=0402, ComponentLink1Description=https://datasheet.ciiva.com/2452/pyu-rc0402-51-rohs-l-6-2452608.pdf?src-supplier=Digi-Key, ComponentLink1URL=https://datasheet.ciiva.com/2452/pyu-rc0402-51-rohs-l-6-2452608.pdf?src-supplier=Digi-Key, ComponentLink2Description=https://datasheet.ciiva.com/11808/0900766b80c66297-11808195.pdf?src-supplier=RSComponents, ComponentLink2URL=https://datasheet.ciiva.com/11808/0900766b80c66297-11808195.pdf?src-supplier=RSComponents, ComponentLink3Description=https://datasheet.ciiva.com/2452/pyu-r-int-thick-7-2452609.pdf?src-supplier=Digi-Key, ComponentLink3URL=https://datasheet.ciiva.com/2452/pyu-r-int-thick-7-2452609.pdf?src-supplier=Digi-Key, ComponentLink4Description=https://datasheet.ciiva.com/22747/1018594-22747515.pdf?src-supplier=Element14, ComponentLink4URL=https://datasheet.ciiva.com/22747/1018594-22747515.pdf?src-supplier=Element14, ComponentLink5Description=https://datasheet.ciiva.com/7983/1018594-7983535.pdf?src-supplier=Element14, ComponentLink5URL=https://datasheet.ciiva.com/7983/1018594-7983535.pdf?src-supplier=Element14, ComponentLink6Description=https://datasheet.ciiva.com/2452/pyu-r-int-thick-7-2452610.pdf?src-supplier=Digi-Key, ComponentLink6URL=https://datasheet.ciiva.com/2452/pyu-r-int-thick-7-2452610.pdf?src-supplier=Digi-Key, ComponentLink7Description=https://datasheet.ciiva.com/8896/pyu-rc0402-51-rohs-l-6-8896201.pdf?src-supplier=Avnet, ComponentLink7URL=https://datasheet.ciiva.com/8896/pyu-rc0402-51-rohs-l-6-8896201.pdf?src-supplier=Avnet, ComponentLink8Description=https://datasheet.ciiva.com/28386/pyu-rc0402-51-rohs-l-6-28386633.pdf?src-supplier=Avnet+Europe, ComponentLink8URL=https://datasheet.ciiva.com/28386/pyu-rc0402-51-rohs-l-6-28386633.pdf?src-supplier=Avnet+Europe, ComponentLink9Description=https://datasheet.ciiva.com/15189/getdatasheetpartid-326379-15189533.pdf?src-supplier=Verical, ComponentLink9URL=https://datasheet.ciiva.com/15189/getdatasheetpartid-326379-15189533.pdf?src-supplier=Verical, Composition="Thick Film", Contact Plating=Tin,Matte, Depth=0.5mm, Features="Moisture Resistant", Height=0.016inch, Lead Free="Lead Free", Length=1mm, Military Standard=Not, Number of Terminations=2, Packaging="Tape and Reel", Pricing 1="1=0.10000, 10=0.01200, 25=0.00920, 50=0.00680, 100=0.00510, 250=0.00388, 500=0.00308, 1000=0.00227, 5000=0.00163 (USD)", Radiation Hardening=No, REACH SVHC=Unknown, Resistance=0mR, RoHS=Yes, Stock 1=69822252, Supplier 1=Digi-Key, Termination=SMD/SMT, Width=0.02inch
R266: library part Resistor, "Thick Film Resistors - SMD 84.5K OHM 1%", Case/Package=0402, Case Code (Metric)=1005, Manufacturer=Yageo, Manufacturer Part Number=RC0402FR-0784K5L, Max Operating Temperature=155°C, Max Power Dissipation=63mW, Min Operating Temperature=-55°C, Power Rating=62.5mW, Supplier Part Number 1=YAG3245CT-ND, Temperature Coefficient=100ppm/°C, Tolerance=1%, Voltage Rating=50V, Case Code (Imperial)=0402, Category="Chip SMD Resistors", ComponentLink1Description=https://datasheet.ciiva.com/16743/pyu-rc0402-51-rohs-l-6-r-16743877.pdf?src-supplier=Future+Electronics, ComponentLink1URL=https://datasheet.ciiva.com/16743/pyu-rc0402-51-rohs-l-6-r-16743877.pdf?src-supplier=Future+Electronics, ComponentLink2Description=https://datasheet.ciiva.com/16857/pyu-rc0402-51-rohs-l-6-16857805.pdf?src-supplier=Avnet+Europe, ComponentLink2URL=https://datasheet.ciiva.com/16857/pyu-rc0402-51-rohs-l-6-16857805.pdf?src-supplier=Avnet+Europe, ComponentLink3Description=https://datasheet.ciiva.com/28396/pyu-rc0402-51-rohs-l-6-28396296.pdf?src-supplier=Avnet+Europe, ComponentLink3URL=https://datasheet.ciiva.com/28396/pyu-rc0402-51-rohs-l-6-28396296.pdf?src-supplier=Avnet+Europe, ComponentLink4Description=https://datasheet.ciiva.com/8888/pyu-rc0402-51-rohs-l-6-8888111.pdf?src-supplier=Avnet, ComponentLink4URL=https://datasheet.ciiva.com/8888/pyu-rc0402-51-rohs-l-6-8888111.pdf?src-supplier=Avnet, Composition="Thick Film", Contact Plating=Tin,Matte, Depth=0.5mm, Features="Moisture Resistant", Height=0.016inch, Lead Free="Lead Free", Length=1mm, Military Standard=Not, Number of Terminations=2, Packaging="Tape and Reel", Pricing 1="1=0,10000, 10=0,01600, 100=0,00640, 1000=0,00289, 2500=0,00251, 5000=0,00207 (USD)", Resistance=84.5kR, RoHS=Yes, Stock 1=1119527, Supplier 1=Digi-Key, Termination=SMD/SMT, Voltage Rating (DC)=50V, Width=0.02inch, Working Voltage=50V
R267: library part Resistor, "RES SMD 4.7K OHM 5% 1/16W 0402", Case/Package=0402, Case Code (Metric)=1005, Manufacturer=Yageo, Manufacturer Part Number=RC0402JR-074K7L, Max Operating Temperature=155°C, Max Power Dissipation=63mW, Min Operating Temperature=-55°C, Package Quantity=1, Supplier Part Number 1=311-4.7KJRCT-ND, Temperature Coefficient=100ppm/°C, Tolerance=5%, Voltage Rating=50V, Case Code (Imperial)=0402, Category="Chip SMD Resistors", ComponentLink1Description=https://datasheet.ciiva.com/2452/pyu-r-int-thick-7-2452611.pdf?src-supplier=Digi-Key, ComponentLink1URL=https://datasheet.ciiva.com/2452/pyu-r-int-thick-7-2452611.pdf?src-supplier=Digi-Key, ComponentLink2Description=https://datasheet.ciiva.com/2452/pyu-r-int-thick-7-2452612.pdf?src-supplier=Digi-Key, ComponentLink2URL=https://datasheet.ciiva.com/2452/pyu-r-int-thick-7-2452612.pdf?src-supplier=Digi-Key, ComponentLink3Description=https://datasheet.ciiva.com/2452/pyu-r-int-thick-7-2452613.pdf?src-supplier=Digi-Key, ComponentLink3URL=https://datasheet.ciiva.com/2452/pyu-r-int-thick-7-2452613.pdf?src-supplier=Digi-Key, ComponentLink4Description=https://datasheet.ciiva.com/46412/1018594-46412841.pdf?src-supplier=Element14, ComponentLink4URL=https://datasheet.ciiva.com/46412/1018594-46412841.pdf?src-supplier=Element14, ComponentLink5Description=https://datasheet.ciiva.com/16800/pyu-rc0402-51-rohs-l-6-r-16800266.pdf?src-supplier=Future+Electronics, ComponentLink5URL=https://datasheet.ciiva.com/16800/pyu-rc0402-51-rohs-l-6-r-16800266.pdf?src-supplier=Future+Electronics, ComponentLink6Description=https://datasheet.ciiva.com/7850/1018594-7850222.pdf?src-supplier=Element14, ComponentLink6URL=https://datasheet.ciiva.com/7850/1018594-7850222.pdf?src-supplier=Element14, ComponentLink7Description=https://datasheet.ciiva.com/7850/1018594-7850223.pdf?src-supplier=Element14, ComponentLink7URL=https://datasheet.ciiva.com/7850/1018594-7850223.pdf?src-supplier=Element14, Composition="Thick Film", Depth=0.5mm, Features="Moisture Resistant", Height=0.016inch, Lead Free="Lead Free", Length=0.039inch, Military Standard=Not, Number of Terminations=2, Packaging="Tape and Reel", Power Rating=63mW, Pricing 1="1=0,10000, 10=0,01300, 100=0,00530, 1000=0,00236, 2500=0,00205, 5000=0,00169 (USD)", REACH SVHC="No SVHC", Resistance=4.7kR, RoHS=Yes, Stock 1=19884749, Supplier 1=Digi-Key, Termination=SMD/SMT, Width=0.02inch
R268 R272 R285 R289 R303 R307: library part Resistor, Case/Package=0402, Case Code (Metric)=1005, Manufacturer 1=Yageo, Manufacturer Part Number 1=RC0402FR-072RL, Max Operating Temperature=155°C, Max Power Dissipation=63mW, Min Operating Temperature=-55°C, Supplier Part Number 1=YAG3369CT-ND, Temperature Coefficient=200ppm/°C, Tolerance=1%, Voltage Rating=50V, Case Code (Imperial)=0402, ComponentLink1Description=https://datasheet.ciiva.com/11808/0900766b80c66297-11808785.pdf?src-supplier=RSComponents, ComponentLink1URL=https://datasheet.ciiva.com/11808/0900766b80c66297-11808785.pdf?src-supplier=RSComponents, ComponentLink2Description=https://datasheet.ciiva.com/16868/pyu-rc0402-51-rohs-l-6-16868438.pdf?src-supplier=Avnet+Europe, ComponentLink2URL=https://datasheet.ciiva.com/16868/pyu-rc0402-51-rohs-l-6-16868438.pdf?src-supplier=Avnet+Europe, ComponentLink3Description=https://datasheet.ciiva.com/5596/pyu-rc0402-51-rohs-l-6-r-5596055.pdf?src-supplier=Mouser, ComponentLink3URL=https://datasheet.ciiva.com/5596/pyu-rc0402-51-rohs-l-6-r-5596055.pdf?src-supplier=Mouser, ComponentLink4Description=https://datasheet.ciiva.com/28415/pyu-rc0402-51-rohs-l-6-28415608.pdf?src-supplier=Avnet+Europe, ComponentLink4URL=https://datasheet.ciiva.com/28415/pyu-rc0402-51-rohs-l-6-28415608.pdf?src-supplier=Avnet+Europe, ComponentLink5Description=https://datasheet.ciiva.com/8894/pyu-rc0402-51-rohs-l-6-8894730.pdf?src-supplier=Avnet, ComponentLink5URL=https://datasheet.ciiva.com/8894/pyu-rc0402-51-rohs-l-6-8894730.pdf?src-supplier=Avnet, ComponentLink6Description=https://datasheet.ciiva.com/7849/1018594-7849950.pdf?src-supplier=Element14, ComponentLink6URL=https://datasheet.ciiva.com/7849/1018594-7849950.pdf?src-supplier=Element14, ComponentLink7Description=https://datasheet.ciiva.com/7849/1018594-7849951.pdf?src-supplier=Element14, ComponentLink7URL=https://datasheet.ciiva.com/7849/1018594-7849951.pdf?src-supplier=Element14, Composition="Thick Film", Contact Plating=Tin,Matte, Depth=0.5mm, Features="Moisture Resistant", Height=0.016inch, Lead Free="Lead Free", Length=1mm, Military Standard=Not, Number of Terminations=2, Packaging="Tape and Reel", Power Rating=63mW, Pricing 1="1=0,10000, 10=0,02400, 100=0,00970, 1000=0,00435, 2500=0,00377, 5000=0,00312 (USD)", REACH SVHC=Unknown, Resistance=2R, RoHS=Yes, Stock 1=417064, Supplier 1=Digi-Key, Termination=SMD/SMT, Voltage Rating (DC)=50V, Width=0.02inch
R271: library part Resistor, "RES SMD 5K OHM 0.1% 1/20W 0402", Case Code (Imperial)=0402, Case Code (Metric)=1005, Manufacturer="Vishay Dale", Manufacturer Part Number=PNM0402E5001BST1, Max Operating Temperature=155°C, Max Power Dissipation=50mW, Min Operating Temperature=-55°C, Package Quantity=1000, Supplier Part Number 1=541-1901-1-ND, Temperature Coefficient=25ppm/°C, Tolerance=0.1%, Case/Package=0402, Category="Chip SMD Resistors", ComponentLink1Description=https://datasheet.ciiva.com/29717/pnm-29717416.pdf?src-supplier=Digi-Key, ComponentLink1URL=https://datasheet.ciiva.com/29717/pnm-29717416.pdf?src-supplier=Digi-Key, ComponentLink2Description=https://datasheet.ciiva.com/29717/pnm-29717417.pdf?src-supplier=Digi-Key, ComponentLink2URL=https://datasheet.ciiva.com/29717/pnm-29717417.pdf?src-supplier=Digi-Key, ComponentLink3Description=https://datasheet.ciiva.com/29717/pnm-29717418.pdf?src-supplier=Digi-Key, ComponentLink3URL=https://datasheet.ciiva.com/29717/pnm-29717418.pdf?src-supplier=Digi-Key, Composition="Thin Film", Features="Moisture Resistant,Anti-Sulfur", Height=0.033inch, Length=0.042inch, Number of Terminations=2, Packaging="Tape and Reel", Pricing 1="1=1,08000, 10=0,95500, 100=0,69300 (USD)", Resistance=5kR, RoHS=Yes, Stock 1=32246, Supplier 1=Digi-Key, Width=0.022inch
R273 R277 R278 R295 R296 R313 R314: library part Resistor, "CRGCQ 0402 12K 1%", Manufacturer="TE Connectivity", Manufacturer Part Number=CRGCQ0402F12K, Supplier Part Number 1=A129640CT-ND, ComponentLink1Description=https://www.te.com/commerce/DocumentDelivery/DDEController?Action=srchrtrv&DocNm=1773204-3&DocType=DS&DocLang=English&src-supplier=Digi-Key, ComponentLink1URL=https://www.te.com/commerce/DocumentDelivery/DDEController?Action=srchrtrv&DocNm=1773204-3&DocType=DS&DocLang=English&src-supplier=Digi-Key, ComponentLink2Description=http://www.te.com/commerce/DocumentDelivery/DDEController?Action=srchrtrv&DocNm=1773204-3&DocType=DS&DocLang=English&src-supplier=Digi-Key, ComponentLink2URL=http://www.te.com/commerce/DocumentDelivery/DDEController?Action=srchrtrv&DocNm=1773204-3&DocType=DS&DocLang=English&src-supplier=Digi-Key, Pricing 1="1=0,10000, 10=0,02100, 100=0,00860, 1000=0,00387, 2500=0,00336, 5000=0,00277 (USD)", Resistance=12kR, RoHS=No, Stock 1=103306, Supplier 1=Digi-Key
R275 R280: library part Resistor, "RES SMD 47K OHM 1% 1/16W 0402", Case Code (Imperial)=0402, Case Code (Metric)=1005, Manufacturer=Yageo, Manufacturer Part Number=RC0402FR-0747KL, Max Operating Temperature=155°C, Max Power Dissipation=63mW, Min Operating Temperature=-55°C, Package Quantity=1, Power Rating=62.5mW, Supplier Part Number 1=311-47.0KLRCT-ND, Temperature Coefficient=100ppm/°C, Tolerance=1%, Voltage Rating=50V, Case/Package=0402, Category="Chip SMD Resistors", ComponentLink1Description=https://datasheet.ciiva.com/16793/pyu-rc0402-51-rohs-l-6-r-16793430.pdf?src-supplier=Future+Electronics, ComponentLink1URL=https://datasheet.ciiva.com/16793/pyu-rc0402-51-rohs-l-6-r-16793430.pdf?src-supplier=Future+Electronics, ComponentLink2Description=https://datasheet.ciiva.com/15189/getdatasheetpartid-323748-15189466.pdf?src-supplier=Verical, ComponentLink2URL=https://datasheet.ciiva.com/15189/getdatasheetpartid-323748-15189466.pdf?src-supplier=Verical, ComponentLink3Description=https://datasheet.ciiva.com/2453/pyu-r-int-thick-7-2453388.pdf?src-supplier=Digi-Key, ComponentLink3URL=https://datasheet.ciiva.com/2453/pyu-r-int-thick-7-2453388.pdf?src-supplier=Digi-Key, ComponentLink4Description=https://datasheet.ciiva.com/2453/pyu-r-int-thick-7-2453389.pdf?src-supplier=Digi-Key, ComponentLink4URL=https://datasheet.ciiva.com/2453/pyu-r-int-thick-7-2453389.pdf?src-supplier=Digi-Key, ComponentLink5Description=https://datasheet.ciiva.com/2453/pyu-r-int-thick-7-2453390.pdf?src-supplier=Digi-Key, ComponentLink5URL=https://datasheet.ciiva.com/2453/pyu-r-int-thick-7-2453390.pdf?src-supplier=Digi-Key, ComponentLink6Description=https://datasheet.ciiva.com/46412/1018594-46412839.pdf?src-supplier=Element14, ComponentLink6URL=https://datasheet.ciiva.com/46412/1018594-46412839.pdf?src-supplier=Element14, Composition="Thick Film", Depth=0.5mm, Features="Moisture Resistant", Height=0.016inch, Lead Free="Lead Free", Length=1mm, Military Standard=Not, Number of Terminations=2, Packaging="Tape and Reel", Pricing 1="1=0,10000, 10=0,01600, 100=0,00640, 1000=0,00289, 2500=0,00251, 5000=0,00207 (USD)", REACH SVHC=Unknown, Resistance=47kR, RoHS=Yes, Stock 1=8057541, Supplier 1=Digi-Key, Termination=SMD/SMT, Width=0.5mm
R284: library part Resistor, "SMT Resistor", Supplier Part Number 1=RR05P18.2KDCT-ND, Supplier 1=Digi-Key
R287: library part Resistor, Case/Package=0402, Manufacturer="Stackpole Electronics", Manufacturer Part Number=RNCF0402DTE49K9, Max Operating Temperature=155°C, Min Operating Temperature=-55°C, Power Rating=63mW, Supplier Part Number 1=RNCF0402DTE49K9CT-ND, Tolerance=0.5%, Mount="Surface Mount", Packaging="Tape and Reel", Pricing 1="1 = 0,13000, 10 = 0,12000, 100 = 0,04620, 1000 = 0,02033, 2500 = 0,01756, 5000 = 0,01571 (USD)", Resistance=49.9kR, RoHS=No, Stock 1=19759, Supplier 1=Digi-Key
R288 R298 R306 R316: "RES SMD 3.6 OHM 5% 1/2W 1210", Case/Package=1210, Case Code (Metric)=3225, Manufacturer=Rohm, Manufacturer Part Number=ESR25JZPJ3R6, Max Operating Temperature=155°C, Max Power Dissipation=500mW, Min Operating Temperature=-55°C, Package Quantity=4000, Power="#Circular Reference?", Resistance=3.6R, Supplier Part Number 1=RHM3.6AXCT-ND, Temperature Coefficient=200ppm/°C, Tolerance=5%, Case Code (Imperial)=1210, Category="Chip SMD Resistors", ComponentLink1Description=https://datasheet.ciiva.com/14928/esr-14928566.pdf?src-supplier=Digi-Key, ComponentLink1URL=https://datasheet.ciiva.com/14928/esr-14928566.pdf?src-supplier=Digi-Key, ComponentLink2Description=https://datasheet.ciiva.com/14932/esr-14932183.pdf?src-supplier=Digi-Key, ComponentLink2URL=https://datasheet.ciiva.com/14932/esr-14932183.pdf?src-supplier=Digi-Key, Composition="Thick Film", Features="Automotive AEC-Q200", Height=0.026inch, Length=0.126inch, Number of Terminations=2, Packaging="Cut Tape", Pricing 1="1=0,36000, 10=0,30300, 100=0,11830, 1000=0,04950 (USD)", RoHS=Yes, Stock 1=3497, Supplier 1=Digi-Key, Width=0.098inch